# Altium PCB External_Camera_HAT.PcbDoc (part 3 of 3)
Units mm, origin at the board's own origin, x right, y up, seen from the top; angles counter-clockwise.
Board outline 65 x 56 mm, 4 copper layers (Top Layer, GND Top, GND Bottom, Bottom Layer), stack 1.586 mm thick; 123 components, 112 nets, 537 pads, 357 vias.
Unrouted connection lines stored in the file: 85.
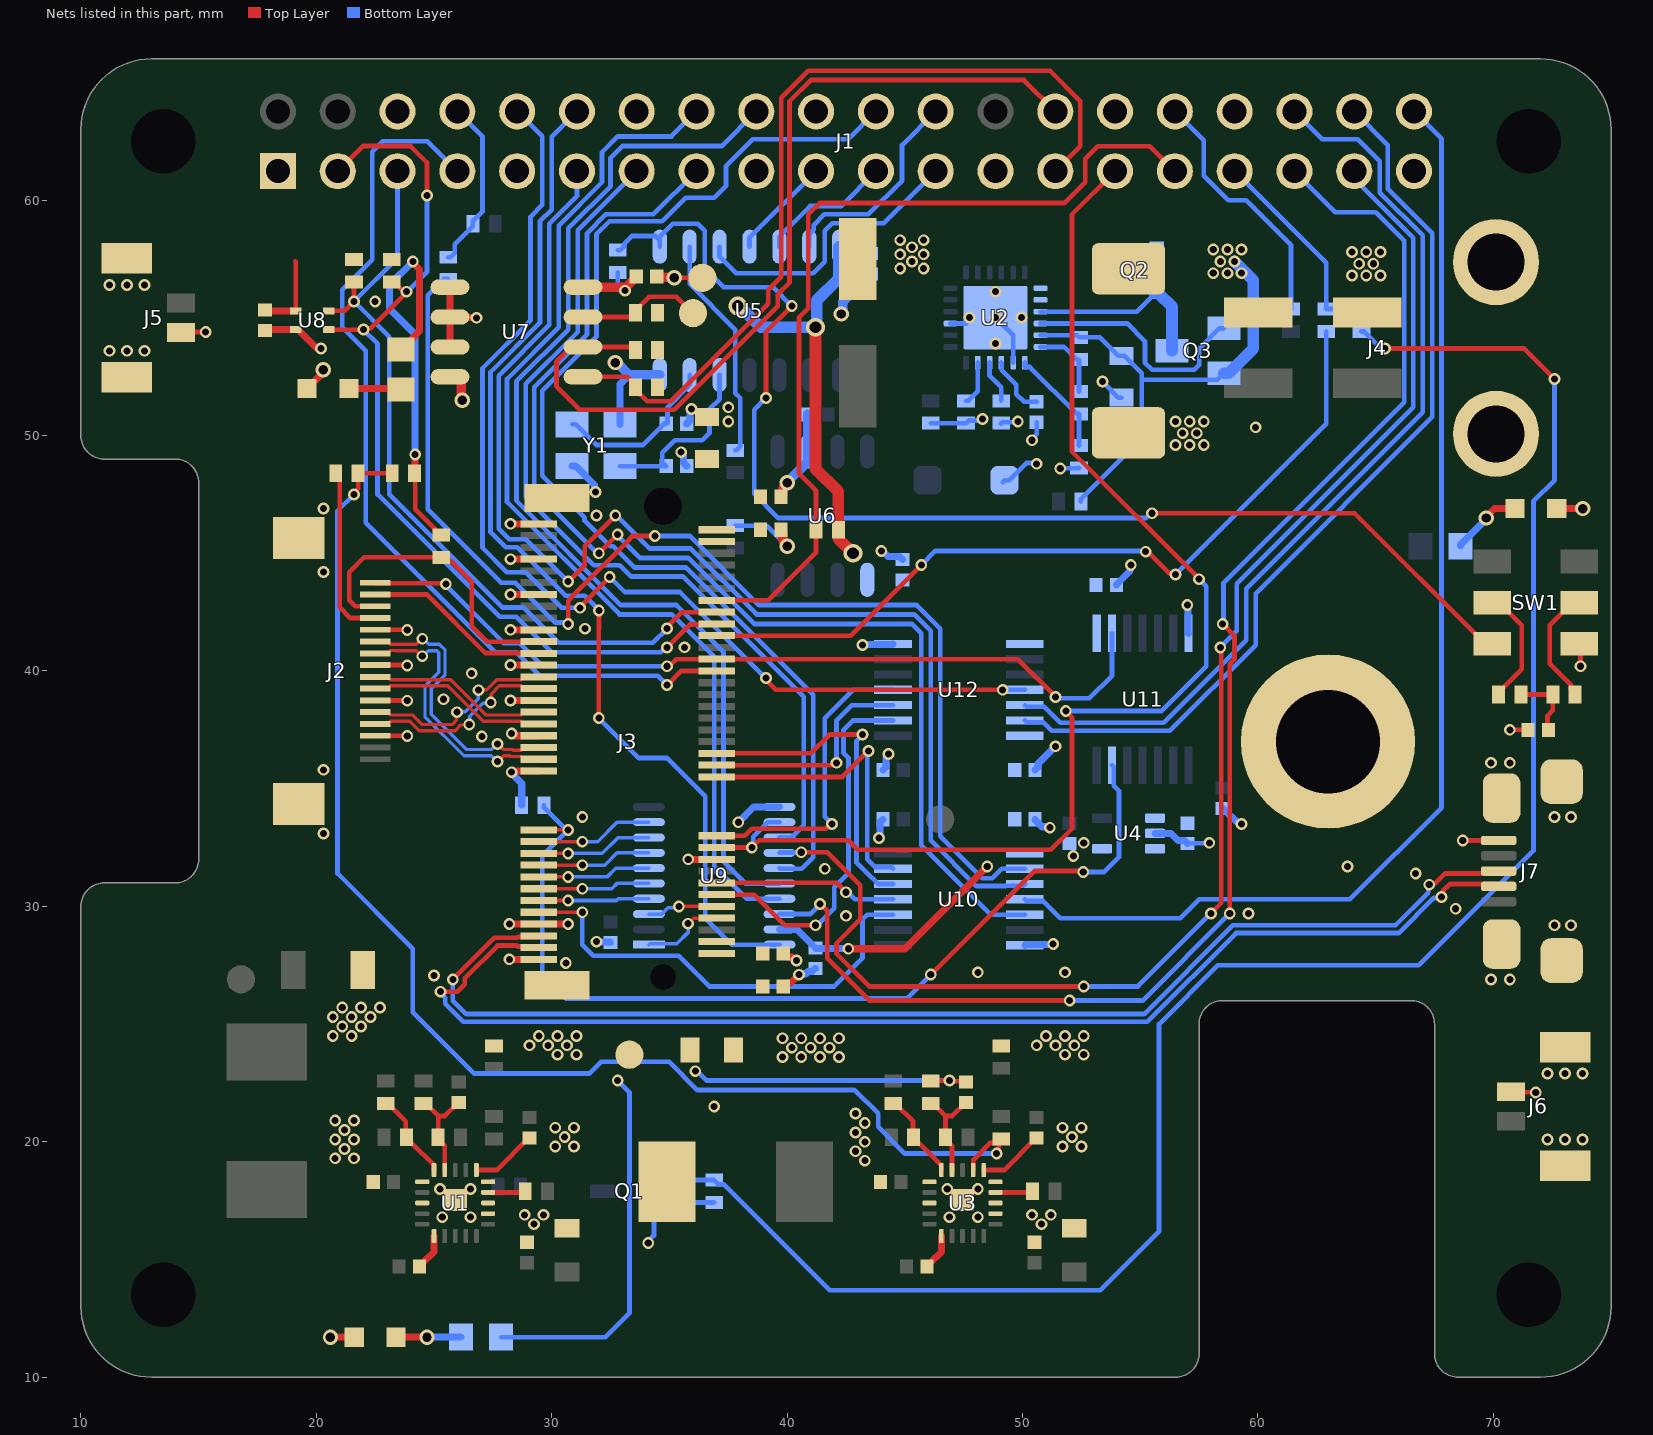
[diagram p4: the nets of this part, all layers, seen from the top]

## Via types
v1: diameter 0.5, hole 0.3, Top Layer to Bottom Layer, tented both sides, 342 vias
v2: diameter 0.65, hole 0.4, Top Layer to Bottom Layer, tented both sides, 12 vias
v3: diameter 0.8, hole 0.5, Top Layer to Bottom Layer, tented both sides, 3 vias

## Nets (pads, with @x,y where several pads share a name; then routed paths per layer and width w, separated by ;. In a path a pad name is that pad's centre, name@x,y a point inside that pad or via, vN(x,y) a via of type N, cw(c..) or ccw(c..) an arc to the next point about the centre after c; other vN are vias at no path point) (continued)
GND: C2.2 C3.2 C4.2 C5.2 C6.2 C7.2 C8.2 C9.2 C12.2 C13.2 C14.2 C15.2 C17.2 C18.2 C19.2 C20.2 C23.2 C24.2 C25.2 C26.2 C28.2 C29.2 C30.2 C31.2 C32.2 C33.2 C34.2 C35.1 C36.2 C37.2 C38.2 C39.2 C40.2 C41.2 D1.2 D2.2 D3.2 D4.1 D5.1 J1.06 J1.09 J1.14 J1.20 J1.25 J1.30 J1.34 J1.39 J2.5 J2.8 J2.11 J2.14 J2.S1 J2.S2 J3.1 J3.7 J3.18 J3.33 J3.39 J3.45 J3.51 J3.57 J3.63 J3.69 J3.75 J3.76 J3.77 J4.1 J4.5 J4.6 J5.2 J5.3 J5.4 J6.2 J6.3 J6.4 J7.5 J7.6 J7.7 J7.8 J7.9 MP1.1 Q1.2 R6.2 R28.2 R34.2 R41.2 R42.2 R43.2 R44.2 R45.2 R46.2 SW1.6 TP5.TP U1.7 U1.8 U1.10 U1.16 U1.18 U1.21 U2.8 U2.15 U2.25 U3.7 U3.8 U3.10 U3.16 U3.18 U3.21 U4.2 U4.4 U5.7 U6.2 U7.1 U7.2 U7.3 U7.4 U8.4 U9.11 U10.7 U11.7 U12.7 Y1.2 Y1.4 | length 90
  Top Layer w0.2: J5.2@14.25,54.375 14.275,54.4 v1(15.3,54.4) ; J2.14@22.5,37.25 v1@23.85,37.25 ; J2.11@22.5,38.75 v1@23.85,38.75 ; J2.8@22.5,40.25 v1@23.85,40.25 ; J2.5@22.5,41.75 v1@23.85,41.75 ; v2(35.2,56.7) TP5.TP@36.4,56.7 ; v1(68.7,32.8) J7.5@70.225,32.8 ; v1(70.7,37.5) C35.1@71.465,37.5 ; J6.2@70.75,22.125 70.775,22.1 v1(71.8,22.1) ; SW1.6@73.65,41.15 73.7,41.1 v1(73.7,40.2)
  Top Layer w0.3: C39.2@17.825,54.465 17.86,54.5 19.225,54.5 19.987,53.738 20.162,53.738 v1(20.2,53.7) ; D2.2@19.611,52 20.233,52.622 20.233,52.733 v2(20.3,52.8) ; v2(20.6,11.7) D3.2@21.611,11.7 ; U7.4@25.675,52.495 U7.4@26.08,52.495 ; U7.3@25.675,53.765 U7.2@25.675,55.035 ; U7.1@25.675,56.305 U7.2@25.675,55.035 ; v1(26.8,55) 26.783,55.017 25.693,55.017 U7.2@25.675,55.035 ; v1(28.2,27.75) J3.1@29.45,27.75 ; v1(28.2,29.25) J3.7@29.45,29.25 v1(30.7,29.25) ; v1(28.25,38.75) J3.45@29.45,38.75 ; v1(28.25,40.25) J3.51@29.45,40.25 ; v1(28.25,41.75) J3.57@29.45,41.75 ; v1(28.25,43.25) J3.63@29.45,43.25 ; v1(28.25,44.75) J3.69@29.45,44.75 ; v1(28.25,46.25) J3.75@29.45,46.25 ; v1(28.3,35.7) 28.354,35.7 28.404,35.75 J3.33@29.45,35.75 ; v1(28.3,37.346) 28.354,37.346 28.45,37.25 J3.39@29.45,37.25 ; v1(35.8,32) J3.18@37,32 ; C2.2@39.835,26.6 39.835,26.62 39.965,26.75 40.15,26.75 v1(40.5,27.1) ; C3.2@39.835,28 39.835,27.98 39.965,27.85 40.196,27.85 40.346,27.7 v1(40.4,27.7) ; D1.2@72.689,46.9 v2(73.8,46.9)
  Top Layer w0.4: U7.4@26.08,52.495 26.152,52.423 26.152,51.548 v2(26.2,51.5) ; C38.2@34.46,56.754 34.487,56.727 35.173,56.727 v2(35.2,56.7) ; C6.2@39.735,46 39.815,45.92 39.815,45.553 40,45.368 v2(40,45.3) ; C5.2@39.735,47.4 39.815,47.48 39.815,47.747 40,47.932 v2(40,48)
  Bottom Layer w0.2: v1(34.1,15.7) 34.1,15.781 34.341,16.023 Q1.2@34.341,16.947 34.697,16.947 35.174,17.425 R34.2@36.9,17.425 ; R28.2@37.8,46.175 39.125,46.175 v2(40,45.3) ; R42.2@46.1,50.525 R44.2@47.6,50.525 47.718,50.643 48.243,50.643 v1(48.3,50.7) ; U2.15@46.937,54.763 47.6,54.763 47.75,54.913 v1(47.75,55.013) ; v1(48.85,55.013) 49.6,54.263 U2.8@49.6,53.1 ; R41.2@49.088,50.512 R41.2@49.1,50.525 49.138,50.562 49.762,50.562 v1(49.8,50.6) ; D5.1@49.157,48.022 D5.1@49.235,48.1 49.425,48.1 50.159,48.834 50.566,48.834 v1(50.6,48.8) ; v1(50.4,49.8) 50.4,49.856 50.6,50.056 C9.2@50.6,50.565 ; v1(51.6,48.6) 51.613,48.612 52.387,48.612 R43.2@52.4,48.625 ; v1(53.4,52.3) 53.4,52.284 54.073,51.611 C7.2@54.2,51.611 ; C30.2@57,32.665 57.018,32.683 57.916,32.683 v1(57.933,32.7)
  Bottom Layer w0.3: v1(28.3,35.7) 28.3,35.646 28.725,35.221 R6.2@28.725,34.3 ; Y1.4@30.868,48.7 31.018,48.7 31.82,47.898 31.82,47.642 v1(31.858,47.604) ; v1(31.9,28.5) 31.917,28.483 32.483,28.483 C18.2@32.5,28.465 ; Y1.2@32.9,50.478 32.9,52.182 33.293,52.575 ; v1(35.5,49.296) 35.5,49.242 35.605,49.137 35.605,48.83 C37.2@35.735,48.7 ; C36.2@35.735,50.5 35.865,50.63 35.865,50.998 35.942,51.075 v1(35.942,51.129) ; v1(37.926,33.574) 38.578,34.225 U9.11@39.675,34.225 ; v1(40.5,27.1) 40.538,27.138 40.8,27.138 40.897,27.235 41.05,27.235 41.18,27.365 C17.2@41.2,27.365 ; v1(43.2,41.1) 43.225,41.125 44.475,41.125 U12.7@44.5,41.15 ; v1(43.904,32.904) 43.942,32.942 43.942,33.577 C20.2@44.065,33.7 ; v1(44,45.1) 44.054,45.1 44.289,44.865 44.77,44.865 C33.2@44.9,44.735 ; C40.2@44.065,35.8 44.195,35.93 44.195,36.314 44.3,36.419 v1(44.3,36.473) ; U10.7@50.1,28.35 50.125,28.375 51.275,28.375 v1(51.3,28.4) ; C19.2@50.535,33.7 50.535,33.68 50.833,33.382 51.118,33.382 v1(51.156,33.344) ; C41.2@50.535,35.8 50.665,35.93 50.665,36.065 v1(51.4,36.8) ; C28.2@53.985,43.65 53.985,43.67 54.562,44.247 54.562,44.462 v1(54.6,44.5) ; U4.2@55.625,33.1 56.3,33.1 56.605,32.795 56.87,32.795 C30.2@57,32.665 ; v1(57,42.8) 57.025,42.775 57.025,41.625 U11.7@57.05,41.6 ; C29.2@58.5,34.165 58.52,34.165 59.147,33.538 59.262,33.538 v1(59.3,33.5)
  Bottom Layer w0.4: v2(32.7,53.1) 32.768,53.1 33.293,52.575 U5.7@34.59,52.575 ; v2(40,48) 40,48.017 40.865,48.883 C34.2@40.865,50.9 ; v2(42.3,55.165) 42.367,55.232 42.367,55.687 43.548,56.868 C32.2@43.568,56.868
  other v1: 29.25,16.5 50.8,16.5 25.35,16.8 26.55,16.8 46.9,16.8 48.1,16.8 28.85,16.9 29.65,16.9 50.4,16.9 51.2,16.9 25.25,18 26.55,18 46.8,18 48.1,18 43.3,19.2 20.8,19.3 21.6,19.3 42.9,19.6 21.2,19.7 30.15,19.8 30.95,19.8 51.7,19.8 52.5,19.8 43.3,20 20.8,20.1 21.6,20.1 72.3,20.1 73.045,20.1 73.79,20.1 30.55,20.2 52.1,20.2 42.9,20.4 21.2,20.5 30.15,20.6 30.95,20.6 51.7,20.6 52.5,20.6 43.3,20.8 20.8,20.9 21.6,20.9 42.9,21.2 36.9,21.5 72.3,22.9 73.045,22.9 73.79,22.9 39.8,23.6 40.6,23.6 41.4,23.6 42.2,23.6 30.25,23.7 31.05,23.7 51.8,23.7 52.6,23.7 40.2,24 41,24 41.8,24 29.05,24.1 29.85,24.1 30.65,24.1 50.6,24.1 51.4,24.1 52.2,24.1 39.8,24.4 40.6,24.4 41.4,24.4 42.2,24.4 20.7,24.5 21.5,24.5 29.45,24.5 30.25,24.5 31.05,24.5 51,24.5 51.8,24.5 52.6,24.5 21.1,24.9 21.9,24.9 20.7,25.3 21.5,25.3 22.3,25.3 21.1,25.7 21.9,25.7 22.7,25.7 69.9,26.9 70.7,26.9 24.994,27.06 48.1,27.2 51.8,27.2 30.6,27.6 72.6,29.2 73.3,29.2 42.5,29.6 59.6,29.7 68.4,29.9 66.7,31.4 41.6,31.6 63.8,31.7 52.156,32.144 52.6,32.7 20.3,33.1 31.3,33.8 72.6,33.8 73.3,33.8 20.3,35.8 69.9,36.1 70.7,36.1 27.031,37.216 23.863,37.237 23.863,38.737 25.4,38.8 26.6,39.9 23.863,40.237 35.64,41.004 23.863,41.737 31.412,41.797 20.3,44.2 31.9,46.6 20.3,46.9 56.5,49.6 57.1,49.6 57.7,49.6 56.8,50.1 57.4,50.1 59.904,50.349 37.5,50.6 56.5,50.6 57.1,50.6 57.7,50.6 37.5,51.2 11.21,53.6 11.955,53.6 12.7,53.6 48.85,53.913 49.95,55.013 22.5,55.7 48.85,56.113 11.21,56.4 11.955,56.4 12.7,56.4 64,56.8 64.6,56.8 65.2,56.8 44.8,57.1 45.8,57.1 64.3,57.3 64.9,57.3 45.3,57.4 44.8,57.7 45.8,57.7 64,57.8 64.6,57.8 65.2,57.8 45.3,58 44.8,58.3 45.8,58.3
I2C1_SCL: J1.05 J3.60 R33.2 U8.2 | length 34.3
  Top Layer w0.2: U8.2@20.525,55.3 21.2,55.3 v1(21.6,55.7) R33.2@21.6,56.525 ; v1(34.9,41.8) 34.9,41.881 35.519,42.5 J3.60@37,42.5
  Bottom Layer w0.2: J1.05@23.45,61.23 23.45,57.55 v1(21.6,55.7) 23.1,54.2 23.1,47.5 27.9,42.7 28.8,42.7 30.3,41.2 34.3,41.2 v1(34.9,41.8)
I2C1_SDA: J1.03 J3.58 R32.2 U8.1 | length 40.1
  Top Layer w0.2: U8.1@20.525,54.5 v1(22,54.5) 22.057,54.557 22.307,54.557 23.835,56.086 v1(23.835,56.111) 23.778,56.168 23.657,56.168 23.3,56.525 R32.2@23.2,56.525 ; J1.03@20.91,61.23 21.98,62.3 24,62.3 24.7,61.6 v1(24.7,60.2) ; v1(34.9,41) 35.875,41.975 36.975,41.975 J3.58@37,42
  Bottom Layer w0.2: v1(22,54.5) 22.6,53.9 22.6,47.5 27.8,42.3 28.5,42.3 30,40.8 34.633,40.8 34.833,41 v1(34.9,41) ; v1(23.835,56.111) 23.866,56.111 24.7,56.945 v1(24.7,60.2)
ID_SCL: J1.28 R29.2 U7.6 | length 37.5
  Top Layer w0.2: R29.2@33.55,53.632 33.417,53.765 U7.6@31.325,53.765 30.825,53.765 30.2,53.14 30.2,52.1 31.2,51.1 35.2,51.1 39.6,55.5 39.6,56 40.1,56.5 40.1,64.2 41,65.1 50.06,65.1 J1.28@51.39,63.77
ID_SDA: J1.27 R30.2 U7.5 | length 36.3
  Top Layer w0.2: U7.5@31.325,52.495 33.209,52.495 33.55,52.154 R30.2@33.55,52.054 33.55,51.954 34.052,51.452 35.052,51.452 39.2,55.6 39.2,56.2 39.755,56.755 39.755,64.355 40.9,65.5 51.166,65.5 52.455,64.211 52.455,62.295 J1.27@51.39,61.23
ID_WP: R31.2 TP4.TP U7.7 | length 5.4
  Top Layer w0.2: U7.7@31.325,55.035 33.375,55.035 R31.2@33.55,55.21 ; R31.2@33.55,55.21 33.55,55.31 34.14,55.9 35.293,55.9 35.993,55.2 TP4.TP@36,55.2
M2_3V3: C2.1 C3.1 C4.1 C5.1 C6.1 C22.1 C23.1 J3.2 J3.4 J3.72 J3.74 L2.1 R20.1 R37.1 TP2.TP | length 28.5
  Top Layer w0.2: R20.1@46.1,22.575 46.113,22.588 46.888,22.588 v1(46.9,22.6) 46.932,22.568 47.567,22.568 C22.1@47.6,22.535
  Bottom Layer w0.2: R37.1@27.851,11.7 32.283,11.7 33.3,12.717 33.3,22.1 v1(32.8,22.6) ; v1(36.1,23) 36.181,23 36.581,22.6 v1(46.9,22.6)
M2_I2C_ALERT#: J1.31 J3.62 R10.2 | length 37.7
  Top Layer w0.2: J3.62@37,43 39.2,43 41.225,45.025 R10.2@41.225,46 41.225,47.675 40.5,48.4 40.5,55 40.9,55.4 40.9,59.4 41.377,59.877 51.777,59.877 52.66,60.76 52.66,61.76 53.195,62.295 55.405,62.295 J1.31@56.47,61.23
M2_PCM_CLK_1V8: J3.8 U9.1 | length 3.6
  Top Layer w0.15: v1(35.79,29.266) 35.805,29.266 36.04,29.5 J3.8@37,29.5
  Bottom Layer w0.15: U9.1@34.125,28.375 34.165,28.415 35.315,28.415 35.79,28.89 v1(35.79,29.266)
M2_PCM_CLK_3V3: J1.12 U9.20 | length 44.7
  Top Layer w0.2: v1(32,38) 32,41.787 32.004,41.791 32.004,42.562 v1(32,42.566)
  Bottom Layer w0.2: J1.12@31.07,63.77 30,62.7 30,59.6 29.5,59.1 29.5,54.8 27.4,52.7 27.4,45.9 28.046,45.254 28.532,45.254 30.586,43.2 31.4,43.2 32,42.6 v1(32,42.566) ; v1(32,38) 33.7,36.3 34.9,36.3 36.52,34.68 36.52,29.5 37.645,28.375 U9.20@39.675,28.375
M2_PCM_IN_1V8: J3.14 U10.11 | length 7.8
  Top Layer w0.2: J3.14@37,31 42.1,31 v1(42.5,30.6)
  Bottom Layer w0.2: v1(42.5,30.6) 42.581,30.6 42.881,30.3 U10.11@44.5,30.3
M2_PCM_IN_3V3: J1.40 U10.4 | length 50
  Bottom Layer w0.2: U10.4@50.1,30.3 50.175,30.225 50.875,30.225 51.6,29.5 56.7,29.5 57.5,30.3 63.9,30.3 67.8,34.2 67.8,62.6 J1.40@66.63,63.77
M2_PCM_OUT_1V8: J3.12 U12.2 | length 16
  Top Layer w0.2: J3.12@37,30.5 37.002,30.498 38.602,30.498 39.9,29.2 v1(41.2,29.2)
  Bottom Layer w0.2: v1(41.2,29.2) 41.281,29.2 42,29.919 42,30.387 41.996,30.391 41.996,30.809 42.604,31.417 42.604,36.309 42.39,36.523 42.39,37.49 42.8,37.9 U12.2@44.5,37.9
M2_PCM_OUT_3V3: J1.38 U12.13 | length 38.6
  Bottom Layer w0.2: U12.13@50.1,37.9 50.175,37.825 50.875,37.825 51.244,37.456 56.256,37.456 59.9,41.1 59.9,43.29 67.4,50.79 67.4,58.6 65.519,60.481 65.519,62.341 J1.38@64.09,63.77
M2_PCM_SYNC_1V8: J3.10 U9.3 | length 3
  Top Layer w0.15: v1(35.4,30) J3.10@37,30
  Bottom Layer w0.15: U9.3@34.125,29.675 34.675,29.675 34.933,29.933 35.333,29.933 v1(35.4,30)
M2_PCM_SYNC_3V3: J1.35 U9.18 | length 61.7
  Top Layer w0.2: v1(41.4,30.1) 41.413,30.1 41.704,29.809 41.704,28.991 41.7,28.987 41.7,27.8 43.5,26 v1(52,26) ; v1(58.5,42) 59,41.5 59,40.5 58.796,40.296 58.796,33.291 58.8,33.287 v1(58.8,29.7)
  Bottom Layer w0.2: U9.18@39.675,29.675 40.975,29.675 v1(41.4,30.1) ; v1(52,26) 55.1,26 v1(58.8,29.7) ; v1(58.5,42) 58.539,42.039 58.539,43.739 66.218,51.418 66.218,58.282 65.008,59.492 63.288,59.492 J1.35@61.55,61.23
M2_PWR_EN: R7.2 R8.2 R23.1 U3.12 | length 56.6
  Top Layer w0.2: v1(21.596,47.5) 21.596,47.577 21.775,47.756 R8.2@21.775,48.4 R7.2@23.225,48.4 ; U3.12@47.9,18.8 47.9,19.223 48.627,19.95 48.925,19.95 R23.1@48.993,20.018 ; v1(48.9,19.5) 48.9,19.581 48.993,19.674 R23.1@48.993,20.018 ; R23.1@49.1,20.125 R23.1@48.993,20.018
  Bottom Layer w0.2: v1(21.596,47.5) 21.596,47.496 20.9,46.8 20.9,31.4 24.1,28.2 24.1,25.5 26.7,22.9 31.6,22.9 32.1,23.4 34.987,23.4 36.187,22.2 42.876,22.2 43.865,21.211 43.865,20.635 45,19.5 v1(48.9,19.5)
M2_SDIO_CLK_1V8: J3.9 U10.10 | length 19.4
  Top Layer w0.15: J3.9@29.45,29.75 v1(31.3,29.75)
  Bottom Layer w0.2: v1(31.3,29.75) 31.3,28.371 31.771,27.9 34.64,27.9 cw(c34.725,27) 34.81,27.9 35.4,27.9 36.7,26.6 40.287,26.6 40.291,26.596 40.709,26.596 40.713,26.6 42,26.6 43.2,27.8 43.2,29.45 43.4,29.65 U10.10@44.5,29.65
M2_SDIO_CLK_3V3: J1.15 U10.5 | length 51.9
  Top Layer w0.2: v1(32,45) v1(32.8,45.8)
  Bottom Layer w0.2: v1(32,45) 31.941,45 29.263,47.679 29.263,52.063 31.5,54.3 31.5,58.6 32.3,59.4 34.32,59.4 J1.15@36.15,61.23 ; v1(32.8,45.8) 32.8,45.743 33.743,44.8 35.8,44.8 38.6,42 45.3,42 45.7,41.6 45.7,32.6 48.65,29.65 U10.5@50.1,29.65
M2_SDIO_CMD_1V8: J3.11 U9.4 | length 4.7
  Top Layer w0.15: J3.11@29.45,30.25 v1(30.7,30.25)
  Bottom Layer w0.15: v1(30.7,30.25) 32.75,30.25 32.825,30.325 U9.4@34.125,30.325
M2_SDIO_CMD_3V3: J1.16 U9.17 | length 45
  Bottom Layer w0.2: J1.16@36.15,63.77 35.085,62.705 32.805,62.705 32.135,62.035 32.135,60.755 30.3,58.92 30.3,54.6 28.1,52.4 28.1,47.179 32.879,42.4 35.1,42.4 36.9,40.6 36.9,31.7 38.275,30.325 U9.17@39.675,30.325
M2_SDIO_DATA0_1V8: J3.13 U9.5 | length 4.8
  Top Layer w0.15: J3.13@29.45,30.75 v1(31.3,30.75)
  Bottom Layer w0.15: v1(31.3,30.75) 32.55,30.75 32.775,30.975 U9.5@34.125,30.975
M2_SDIO_DATA0_3V3: J1.18 U9.16 | length 46.3
  Bottom Layer w0.2: J1.18@38.69,63.77 37.22,62.3 33,62.3 32.5,61.8 32.5,60.6 30.7,58.8 30.7,54.5 28.5,52.3 28.5,47.242 32.942,42.8 35.3,42.8 37.3,40.8 37.3,31.9 38.225,30.975 U9.16@39.675,30.975
M2_SDIO_DATA1_1V8: J3.15 U9.6 | length 4.8
  Top Layer w0.15: J3.15@29.45,31.25 v1(30.7,31.25)
  Bottom Layer w0.15: v1(30.7,31.25) 32.35,31.25 32.725,31.625 U9.6@34.125,31.625
M2_SDIO_DATA1_3V3: J1.22 U9.15 | length 49.7
  Bottom Layer w0.2: U9.15@39.675,31.625 39.7,31.6 40.613,31.6 41.104,32.091 41.104,38.996 35.7,44.4 33.5,44.4 32.604,45.296 32.491,45.296 31.396,46.391 31.396,46.504 29.6,48.3 29.6,51.9 31.9,54.2 31.9,58.546 32.454,59.1 34.7,59.1 35.7,60.1 36.9,60.1 37.4,60.6 37.4,61.446 38.547,62.593 42.593,62.593 J1.22@43.77,63.77
M2_SDIO_DATA2_1V8: J3.17 U9.7 | length 4.9
  Top Layer w0.15: J3.17@29.45,31.75 v1(31.3,31.75)
  Bottom Layer w0.15: v1(31.3,31.75) 32.25,31.75 32.775,32.275 U9.7@34.125,32.275
M2_SDIO_DATA2_3V3: J1.37 U9.14 | length 61.3
  Top Layer w0.2: v1(40.6,32.3) 41.7,32.3 43.1,30.9 43.1,29.444 42.096,28.44 42.096,27.991 43.487,26.6 v1(52.6,26.6) ; v1(58,29.7) 58.444,30.144 58.444,40.956 v1(58.4,41)
  Bottom Layer w0.2: U9.14@39.675,32.275 39.688,32.287 40.588,32.287 v1(40.6,32.3) ; v1(52.6,26.6) 54.9,26.6 v1(58,29.7) ; v1(58.4,41) 59.1,41.7 59.1,43.7 66.6,51.2 66.6,58.4 64.09,60.91 J1.37@64.09,61.23
M2_SDIO_DATA3_1V8: J3.19 U9.8 | length 5
  Top Layer w0.15: J3.19@29.45,32.25 v1(30.7,32.25)
  Bottom Layer w0.15: v1(30.7,32.25) 32.15,32.25 32.825,32.925 U9.8@34.125,32.925
M2_SDIO_DATA3_3V3: J1.13 U9.13 | length 37.8
  Bottom Layer w0.2: J1.13@33.61,61.23 31.1,58.72 31.1,54.4 28.9,52.2 28.9,47.387 31.791,44.496 32.894,44.496 33.38,44.01 35.59,44.01 40.7,38.9 40.7,33.442 40.183,32.925 U9.13@39.675,32.925
M2_SDIO_RESET#_1V8: J3.23 R6.1 U11.13 | length 40.8
  Top Layer w0.15: J3.23@29.45,33.25 v1(30.7,33.25)
  Top Layer w0.2: v1(46.1,27.104) 50.496,31.5 52.543,31.5 v1(52.579,31.464)
  Bottom Layer w0.2: R6.1@29.675,34.3 29.675,34.2 30.625,33.25 v1(30.7,33.25) 29.6,32.15 29.6,27.1 30.61,26.09 45.1,26.09 46.1,27.09 v1(46.1,27.104) ; v1(52.579,31.464) 53.464,31.464 54.1,32.1 54.1,34.9 53.875,35.125 53.875,35.925 U11.13@53.8,36
M2_SDIO_WAKE#_1V8: J3.21 U9.9 | length 5
  Top Layer w0.15: J3.21@29.45,32.75 v1(31.3,32.75)
  Bottom Layer w0.15: v1(31.3,32.75) 31.95,32.75 32.775,33.575 U9.9@34.125,33.575
M2_SUSCLK: J1.07 J3.50 | length 39
  Top Layer w0.2: v1(34.9,39.4) 35.5,40 J3.50@37,40
  Bottom Layer w0.2: J1.07@25.99,61.23 24.72,62.5 22.817,62.5 22.377,62.06 22.377,57.477 21.096,56.196 21.096,54.604 22.1,53.6 22.1,46.3 27.6,40.8 28.5,40.8 29.5,39.8 34.5,39.8 v1(34.9,39.4)
M2_UART_CTS_1V8: J3.36 U10.12 | length 14
  Top Layer w0.2: J3.36@37,36.5 41,36.5 41.8,37.3 v1(43.2,37.3)
  Bottom Layer w0.2: v1(43.2,37.3) 43.2,37.283 42.949,37.033 42.949,31.855 43.614,31.19 43.635,31.19 43.875,30.95 U10.12@44.5,30.95
M2_UART_CTS_3V3: J1.11 U10.3 | length 53.2
  Top Layer w0.2: v1(30.7,43.8) 31.4,44.5 31.4,45.3 v1(32.7,46.6)
  Bottom Layer w0.2: v1(30.7,43.8) 28.9,45.6 28.187,45.6 27.746,46.041 27.746,52.546 29.9,54.7 29.9,59 31.07,60.17 J1.11@31.07,61.23 ; v1(32.7,46.6) 32.762,46.6 34.162,45.2 35.9,45.2 38.7,42.4 45.4,42.4 46.1,41.7 46.1,32.8 48.038,30.862 49.283,30.862 49.296,30.875 50.025,30.875 U10.3@50.1,30.95
M2_UART_RTS_1V8: J3.34 U12.3 | length 9.6
  Top Layer w0.2: J3.34@37,36 41.919,36 42.019,36.1 v1(42.1,36.1)
  Bottom Layer w0.2: v1(42.1,36.1) 42.1,37.9 42.75,38.55 U12.3@44.5,38.55
M2_UART_RTS_3V3: J1.36 U12.12 | length 39.9
  Bottom Layer w0.2: U12.12@50.1,38.55 50.175,38.475 50.925,38.475 51.603,37.797 55.997,37.797 59.5,41.3 59.5,43.5 67,51 67,58.5 65.177,60.323 65.177,61.649 64.233,62.593 62.727,62.593 J1.36@61.55,63.77
M2_UART_RXD_1V8: J3.32 U10.13 | length 12.8
  Top Layer w0.2: J3.32@37,35.5 42.349,35.5 v1(43.453,36.605)
  Bottom Layer w0.2: v1(43.453,36.605) 43.4,36.551 43.4,32 43.725,31.675 44.425,31.675 U10.13@44.5,31.6
M2_UART_RXD_3V3: R1.1 U10.2 | length 51.1
  Top Layer w0.2: v1(30.7,42) 30.7,42.987 31.009,43.296 33.304,45.591 33.304,45.62 33.421,45.737 v1(34.378,45.737)
  Bottom Layer w0.2: R1.1@25.6,56.625 25.575,56.65 25.425,56.65 24.735,55.96 24.735,46.865 27.846,43.754 28.459,43.754 30.155,42.057 30.643,42.057 v1(30.7,42) ; v1(34.378,45.737) 35.863,45.737 38.8,42.8 45.5,42.8 46.5,41.8 46.5,32.987 48.291,31.196 48.709,31.196 49.113,31.6 U10.2@50.1,31.6
M2_UART_TXD_1V8: J3.22 U12.4 | length 13.1
  Top Layer w0.2: J3.22@37,33 38.205,33 38.505,33.3 41.633,33.3 41.833,33.5 v1(41.9,33.5)
  Bottom Layer w0.2: v1(41.9,33.5) 41.596,33.804 41.596,37.996 42.8,39.2 U12.4@44.5,39.2
M2_UART_TXD_3V3: J1.10 U12.11 | length 46.7
  Top Layer w0.2: v1(31.204,42.683) 31.204,42.733 v1(32.463,43.992) ; v1(39.1,39.7) 39.1,39.619 39.519,39.2 v1(49.154,39.2)
  Bottom Layer w0.2: J1.10@28.53,63.77 29.595,62.705 29.595,59.795 29.1,59.3 29.1,54.9 27.059,52.859 27.059,45.229 28.087,44.2 28.9,44.2 30.417,42.683 v1@31.215,42.683 ; v1(32.463,43.992) 33.1,43.355 35.445,43.355 v1(39.1,39.7) ; v1(49.154,39.2) U12.11@50.1,39.2
M2_USB_N: J3.5 J7.3 | length 52.7
  Top Layer w0.2: v1(25.8,26.9) 27.563,28.663 28.514,28.663 28.551,28.7 29.4,28.7 J3.5@29.45,28.75 ; v1(67.277,30.923) 67.334,30.981 67.539,30.981 67.959,31.4 70.125,31.4 J7.3@70.225,31.5
  Bottom Layer w0.2: v1(25.8,26.9) 25.8,26 26.373,25.427 55.165,25.427 58.934,29.196 65.842,29.196 67.234,30.588 67.234,30.88 v1(67.277,30.923)
M2_USB_P: J3.3 J7.2 | length 53.4
  Top Layer w0.2: v1(25.277,26.377) 25.989,26.377 26.304,26.691 26.304,26.942 27.699,28.337 28.514,28.337 28.551,28.3 29.4,28.3 J3.3@29.45,28.25 ; v1(67.8,30.4) 67.857,30.457 67.857,30.662 68.145,30.95 70.125,30.95 J7.2@70.225,30.85
  Bottom Layer w0.2: v1(25.277,26.377) 25.277,26.306 25.473,26.11 25.473,25.865 26.238,25.1 55.3,25.1 59.069,28.869 65.977,28.869 67.465,30.357 67.757,30.357 v1(67.8,30.4)
M2_W_DISABLE1#: J3.56 R3.2 | length 34.4
  Top Layer w0.2: J3.56@37,41.5 42.7,41.5 v1(45.7,44.5) ; v1(55.231,45.069) 55.312,45.069 56.224,44.157 56.443,44.157 v1(56.5,44.1)
  Bottom Layer w0.2: v1(45.7,44.5) 46.3,45.1 55.2,45.1 v1(55.231,45.069) ; v1(56.5,44.1) 62.9,50.5 R3.2@62.9,54.425
M2_WAKE#: J1.29 J3.20 U9.12 | length 53.6
  Top Layer w0.2: J3.20@37,32.5 v1(38.5,32.5) 38.805,32.805 42.595,32.805 43,32.4 44.687,32.4 44.691,32.396 45.109,32.396 45.113,32.4 51.2,32.4 52.1,33.3 52.1,38.037 51.839,38.298 v1(51.839,38.304) ; J1.29@53.93,61.23 52.1,59.4 52.1,49.313 57.5,43.913 v1(57.5,43.9)
  Bottom Layer w0.2: v1(38.5,32.5) 38.557,32.557 38.557,32.964 39.168,33.575 U9.12@39.675,33.575 ; v1(51.839,38.304) 55.904,38.304 57.8,40.2 57.8,43.6 v1(57.5,43.9)
NetC9_1: C9.1 U2.9 | length 2.6
  Bottom Layer w0.2: U2.9@49.1,53.1 49.12,53.08 49.12,52.78 49.735,52.165 49.735,51.765 50.065,51.435 C9.1@50.6,51.435
NetC10_2: C10.2 U1.1 | length 1.6
  Top Layer w0.3: C10.2@24.385,14.7 24.385,14.72 24.768,15.103 24.788,15.103 25,15.315 U1.1@25,16
NetC11_2: C11.2 R14.2 R15.1 U1.14 | length 4.4
  Top Layer w0.2: R14.2@24.55,21.625 24.65,21.625 25.175,21.1 ; U1.14@25.45,18.8 25.45,19.825 25.175,20.1 R15.1@25.175,20.2 25.175,21.1 ; C11.2@26.05,21.665 26.03,21.665 25.465,21.1 25.175,21.1
NetC16_1: C16.1 U1.11 | length 2.8
  Top Layer w0.2: U1.11@26.8,18.8 27.665,18.8 29.03,20.165 C16.1@29.05,20.165
NetC21_2: C21.2 U3.1 | length 1.6
  Top Layer w0.3: C21.2@45.935,14.7 45.935,14.72 46.318,15.103 46.338,15.103 46.55,15.315 U3.1@46.55,16
NetC22_2: C22.2 R20.2 R21.1 U3.14 | length 4.4
  Top Layer w0.2: R20.2@46.1,21.625 46.2,21.625 46.725,21.1 ; U3.14@47,18.8 47,19.825 46.725,20.1 R21.1@46.725,20.2 46.725,21.1 ; C22.2@47.6,21.665 47.58,21.665 47.015,21.1 46.725,21.1
NetC27_1: C27.1 U3.11 | length 2.8
  Top Layer w0.2: U3.11@48.35,18.8 49.215,18.8 50.58,20.165 C27.1@50.6,20.165
NetC35_2: C35.2 R25.2 R26.2 | length 3
  Top Layer w0.2: R25.2@71.175,39 R26.2@72.525,39 72.525,38.325 72.3,38.1 72.3,37.535 C35.2@72.335,37.5
NetC36_1: C36.1 U5.6 Y1.1 | length 7.2
  Bottom Layer w0.2: Y1.1@30.868,50.478 31.018,50.478 31.896,49.6 33.885,49.6 C36.1@34.825,50.54 ; C36.1@34.865,50.5 34.918,50.553 34.918,51.208 35.86,52.15 U5.6@35.86,52.575
NetC37_1: C37.1 U5.5 Y1.3 | length 7.6
  Bottom Layer w0.2: Y1.3@32.9,48.7 34.783,48.7 C37.1@34.865,48.7 34.7,48.865 34.7,49.27 35.23,49.8 36.391,49.8 36.7,50.109 36.7,51.113 37.13,51.543 U5.5@37.13,52.575
NetD1_1: D1.1 R35.2 | length 3.1
  Top Layer w0.3: v2(69.7,46.5) 69.7,46.545 70.055,46.9 D1.1@70.911,46.9
  Bottom Layer w0.3: R35.2@68.6,45.3 68.6,45.364 69.7,46.464 v2(69.7,46.5)
NetD2_1: D2.1 R36.2 | length 2.2
  Top Layer w0.3: D2.1@21.389,52 23.549,52 R36.2@23.6,51.949
NetD3_1: D3.1 R37.2 | length 2.8
  Top Layer w0.3: D3.1@23.389,11.7 v2(24.7,11.7)
  Bottom Layer w0.3: v2(24.7,11.7) R37.2@26.149,11.7
NetJ1_08: J1.08 R1.2 R2.2 | length 7.3
  Bottom Layer w0.2: R1.2@25.6,57.575 25.7,57.575 25.875,57.75 25.875,58.125 26.65,58.9 R2.2@26.65,59 26.65,59.1 27.055,59.505 27.055,62.705 J1.08@25.99,63.77
NetJ1_32: J1.32 R4.2 | length 10.9
  Bottom Layer w0.2: J1.32@56.47,63.77 57.7,62.54 57.7,61.034 58.734,60 59.5,60 61.4,58.1 R4.2@61.4,55.375
NetJ1_33: J1.33 R3.1 R5.1 | length 9
  Bottom Layer w0.2: J1.33@59.01,61.23 62.9,57.34 R3.1@62.9,55.375 R5.1@64.4,55.375
NetQ2_4: Q2.4 Q3.3 U2.3 | length 8
  Bottom Layer w0.2: U2.3@50.762,55.263 54.847,55.263 55.635,56.05 Q2.4@55.7,56.05
  Bottom Layer w0.5: Q2.4@55.7,56.05 55.765,56.05 56.353,55.463 Q3.3@56.353,53.6
NetQ2_5-6-7-8: Q2.5-6-7-8 U2.1 U2.2
NetQ3_1: Q3.1 U2.4 | length 10.3
  Bottom Layer w0.2: U2.4@50.762,54.763 54.437,54.763 55.2,54 55.2,53.1 55.5,52.8 57.3,52.8 57.5,53 57.5,53.697 58.353,54.55 Q3.1@58.553,54.55
NetR11_2: R11.2 U1.9 | length 1.6
  Top Layer w0.2: U1.9@27.3,17.85 28.825,17.85 R11.2@28.875,17.9
NetR12_2: R12.2 R16.1 U1.15 | length 3.8
  Top Layer w0.2: R16.1@22.95,21.625 23.05,21.625 23.8,20.875 23.8,20.225 R12.2@23.825,20.2 23.825,20.1 24,19.925 24.075,19.925 25,19 U1.15@25,18.8
NetR18_2: R18.2 U3.9 | length 1.6
  Top Layer w0.2: U3.9@48.85,17.85 50.375,17.85 R18.2@50.425,17.9
NetR19_2: R19.2 R22.1 U3.15 | length 3.8
  Top Layer w0.2: R22.1@44.5,21.625 44.6,21.625 45.35,20.875 45.35,20.225 R19.2@45.375,20.2 45.375,20.1 45.55,19.925 45.625,19.925 46.55,19 U3.15@46.55,18.8
NetR25_1: R25.1 SW1.2 | length 5
  Top Layer w0.2: SW1.2@69.95,42.9 70.25,42.9 71.2,41.95 71.2,40.075 70.225,39.1 R25.1@70.225,39
NetR26_1: R26.1 SW1.5 | length 5
  Top Layer w0.2: R26.1@73.475,39 73.3,39.175 73.3,39.4 72.4,40.3 72.4,41.95 73.35,42.9 SW1.5@73.65,42.9
NetR27_2: R27.2 U5.9 | length 9.6
  Bottom Layer w0.2: U5.9@35.86,58.025 35.86,56.44 37.8,54.5 37.8,51.8 38.004,51.596 38.004,49.55 37.829,49.375 R27.2@37.8,49.375
NetR38_2: R38.2 R40.1 U2.6 | length 3.2
  Bottom Layer w0.2: U2.6@50.762,53.763 51.762,53.763 52.3,53.225 R38.2@52.4,53.225 R40.1@52.4,51.875
NetR40_2: R40.2 R43.1 U2.7 | length 4.7
  Bottom Layer w0.2: U2.7@50.1,53.1 50.1,52.93 50.12,52.91 50.315,52.91 52.3,50.925 R40.2@52.4,50.925 R43.1@52.4,49.575
NetR41_1: R41.1 U2.10 | length 1.8
  Bottom Layer w0.2: U2.10@48.6,53.1 48.6,52.55 49.1,52.05 R41.1@49.1,51.475
NetR44_1: R44.1 U2.11 | length 1.9
  Bottom Layer w0.2: R44.1@47.6,51.475 47.7,51.475 48.1,51.875 U2.11@48.1,53.1
PCIE_CLK_N: J2.12 J3.49 | length 8.4
  Top Layer w0.14: J2.12@22.5,38.25 23.025,38.25 23.141,38.134 24.08,38.134 24.484,37.73 25.786,37.73 25.954,37.898 25.954,38.232 v1(25.972,38.25) ; v1(26.886,39.186) 26.904,39.204 27.238,39.204 27.668,39.634 28.709,39.634 28.825,39.75 J3.49@29.45,39.75
  Bottom Layer w0.14: v1(25.972,38.25) 25.99,38.268 26.325,38.268 26.879,38.822 26.879,39.179 v1(26.886,39.186)
PCIE_CLK_P: J2.13 J3.47 | length 8.4
  Top Layer w0.14: J2.13@22.5,37.75 23.025,37.75 23.141,37.866 23.969,37.866 24.373,37.462 25.897,37.462 26.143,37.708 26.477,37.708 v1(26.495,37.727) ; v1(27.409,38.663) 27.427,38.681 27.427,39.015 27.779,39.366 28.709,39.366 28.825,39.25 J3.47@29.45,39.25
  Bottom Layer w0.14: v1(26.495,37.727) 26.514,37.745 26.514,38.079 27.068,38.633 27.38,38.633 v1(27.409,38.663)
PCIE_CLKREQ_N: J2.2 J3.53 | length 8
  Top Layer w0.2: J2.2@22.5,43.25 24.688,43.25 27.174,40.763 29.437,40.763 J3.53@29.45,40.75
PCIE_DET_WAKE: J2.3 J3.55 R9.2 | length 13.3
  Top Layer w0.2: J2.3@22.5,42.75 21.65,42.75 21.4,43 21.4,44.2 22.025,44.825 R9.2@25.3,44.825 25.475,44.65 25.75,44.65 26.6,43.8 26.6,41.9 27.254,41.246 29.446,41.246 J3.55@29.45,41.25
PCIE_PWR_EN: J2.4 R8.1 | length 7.5
  Top Layer w0.2: R8.1@20.825,48.4 21,48.225 21,42.7 21.45,42.25 J2.4@22.5,42.25
PCIE_RST_B: J2.1 J3.52 U11.2 | length 35.8
  Top Layer w0.2: J2.1@22.5,43.75 22.525,43.725 25.475,43.725 v1(25.5,43.7) ; v1(34.9,40.2) 34.981,40.2 35.281,40.5 J3.52@37,40.5 49.8,40.5 v1(51.4,38.9)
  Bottom Layer w0.2: v1(25.5,43.7) 25.5,43.641 27.951,41.19 28.62,41.19 29.61,40.2 v1(34.9,40.2) ; v1(51.4,38.9) 51.457,38.843 52.843,38.843 53.8,39.8 U11.2@53.8,41.6
PCIE_RX_N: J2.9 J3.43 | length 7.7
  Top Layer w0.14: J2.9@22.5,39.75 23.025,39.75 23.141,39.634 25.702,39.634 27.202,38.134 28.709,38.134 28.825,38.25 J3.43@29.45,38.25
PCIE_RX_P: J2.10 J3.41 | length 7.7
  Top Layer w0.14: J2.10@22.5,39.25 23.025,39.25 23.141,39.366 25.592,39.366 27.092,37.866 28.709,37.866 28.825,37.75 J3.41@29.45,37.75
PCIE_TX_N: J2.6 J3.37 | length 11.7
  Top Layer w0.14: J2.6@22.5,41.25 23.025,41.25 23.141,41.134 23.471,41.134 23.472,41.133 24.242,41.133 24.477,41.368 v1(24.504,41.368) ; v1(27.7,36.9) 27.726,36.9 27.962,36.664 28.332,36.664 28.362,36.634 28.709,36.634 28.825,36.75 J3.37@29.45,36.75
  Bottom Layer w0.14: v1(24.504,41.368) 24.528,41.368 24.766,41.13 25.229,41.13 25.467,40.891 25.467,39.836 24.88,39.248 24.88,38.167 26.383,36.664 27.438,36.664 27.674,36.9 v1(27.7,36.9)
PCIE_TX_P: J2.7 J3.35 | length 11.7
  Top Layer w0.14: J2.7@22.5,40.75 23.025,40.75 23.141,40.866 23.361,40.866 23.362,40.865 24.238,40.865 24.475,40.628 v1(24.5,40.628) ; v1(27.7,36.16) 27.726,36.16 27.962,36.396 28.222,36.396 28.252,36.366 28.709,36.366 28.825,36.25 J3.35@29.45,36.25
  Bottom Layer w0.14: v1(24.5,40.628) 24.528,40.628 24.762,40.862 25.118,40.862 25.2,40.78 25.2,39.946 24.612,39.359 24.612,38.057 26.273,36.396 27.438,36.396 27.674,36.16 v1(27.7,36.16)
PI_3V3: C17.1 C19.1 C28.1 C30.1 C32.1 C33.1 C38.1 C39.1 C41.1 J1.01 J1.17 R7.1 R9.1 R10.1 R24.1 R29.1 R30.1 R31.1 R32.1 R33.1 R36.1 U4.1 U4.3 U5.14 U6.5 U7.8 U8.3 U9.19 U10.1 U11.1 U12.8 U12.14 | length 53.8
  Top Layer w0.2: 19.1,57.4 19.125,57.375 U8.3@19.125,55.3 ; R7.1@24.2,48.375 24.2,46.875 25.025,46.05 25.025,45.95 25.2,45.775 R9.1@25.3,45.775
  Top Layer w0.3: C39.1@17.825,55.335 17.86,55.3 U8.3@19.125,55.3 ; R36.1@23.6,53.651 23.664,53.651 24.022,54.009 24.022,54.072 24.389,54.44 24.389,57.057 24.1,57.346 v1(24.1,57.4) ; R7.1@24.2,48.375 24.188,48.388 24.188,49.188 v1(24.2,49.2) ; v1(42.6,28.2) 45,28.2 v1(48.5,31.7)
  Top Layer w0.4: U7.8@31.325,56.305 33.161,56.305 33.59,56.734 C38.1@33.59,56.754
  Top Layer w0.5: v3(41.2,54.6) 41.2,48.6 42.175,47.625 R10.1@42.175,45.9 ; R10.1@42.175,46 42.2,45.975 42.2,45.6 v3(42.8,45)
  Bottom Layer w0.2: R24.1@32.8,56.925 32.8,56.463 v1(33.109,56.154)
  Bottom Layer w0.3: v1(24.1,57.4) 23.1,56.4 23.1,55.4 24.2,54.3 v1(24.2,49.2) ; U9.19@39.675,29.025 39.683,29.017 40.418,29.017 C17.1@41.05,28.385 ; C17.1@41.2,28.235 41.217,28.218 42.583,28.218 v1(42.6,28.2)
  Bottom Layer w0.4: U5.14@42.21,58.025 43.262,58.025 43.548,57.738 C32.1@43.568,57.738
  Bottom Layer w0.5: v3(37.9,55.5) 37.981,55.5 38.881,54.6 v3(41.2,54.6) 41.257,54.657 41.257,55.739 42.191,56.672 42.191,58.006 U5.14@42.21,58.025
PWR_CYCLE: Q1.1 R5.2 R34.1 | length 81.8
  Top Layer w0.2: v1(65.4,53.7) 71.3,53.7 v1(72.6,52.4)
  Bottom Layer w0.2: Q1.1@34.341,18.852 34.697,18.852 35.174,18.375 R34.1@36.9,18.375 37.075,18.2 37.3,18.2 41.8,13.7 53.3,13.7 55.8,16.2 55.8,25 58.3,27.5 66.83,27.5 71.7,32.37 71.7,47.2 72.6,48.1 v1(72.6,52.4) ; R5.2@64.4,54.425 64.5,54.425 65.168,53.757 65.343,53.757 v1(65.4,53.7)
SPI_CAN_CS: J1.24 U5.13 | length 9.1
  Bottom Layer w0.2: U5.13@40.94,58.025 40.94,58.558 41.125,58.743 41.125,58.941 41.584,59.4 43.446,59.4 44.88,60.834 44.88,62.34 J1.24@46.31,63.77
SPI_CLK: J1.23 U5.10 | length 12.5
  Bottom Layer w0.2: U5.10@37.13,58.025 37.13,57.6 37.83,56.9 41.1,56.9 41.591,57.391 41.591,58.691 41.916,59.016 44.096,59.016 J1.23@46.31,61.23
SPI_MISO: J1.21 U5.12 | length 5.7
  Bottom Layer w0.2: U5.12@39.67,58.025 39.67,58.45 40.971,59.751 42.291,59.751 J1.21@43.762,61.222
SPI_MOSI: J1.19 U5.11 | length 4.4
  Bottom Layer w0.2: U5.11@38.4,58.025 38.4,58.4 J1.19@41.23,61.23
TERM_DET: R24.2 SW1.3 U5.8 | length 53.6
  Top Layer w0.2: v1(39.1,51.6) 39.1,54.4 v1(40.2,55.5) ; v1(55.5,46.7) 64.1,46.7 69.65,41.15 SW1.3@69.95,41.15
  Bottom Layer w0.2: R24.2@32.8,57.875 32.9,57.875 33.075,58.05 33.075,58.15 33.4,58.475 34.405,58.475 U5.8@34.59,58.29 ; U5.8@34.59,58.025 U5.8@34.59,58.29 ; v1(39.1,51.6) 38.6,51.1 38.6,47.52 39.624,46.496 55.233,46.496 55.437,46.7 v1(55.5,46.7) ; v1(40.2,55.5) 39.4,56.3 37.3,56.3 36.5,57.1 36.5,58.7 36.2,59 35.14,59 34.59,58.45 U5.8@34.59,58.29
VIN: C7.1 D4.2 J4.3 Q2.1 Q2.2 Q2.3 Q3.2 R38.1 R39.1 U2.5 | length 20.8
  Bottom Layer w0.2: U2.5@50.762,54.263 52.312,54.263 R38.1@52.4,54.175 53.287,54.175 54.073,53.389 C7.1@54.2,53.389 54.327,53.389 55.066,52.65 55.066,52.375 ; R39.1@52.475,47.2 52.475,47.3 55.066,49.891 55.066,52.375 ; Q3.2@58.553,52.65 58.278,52.375 55.066,52.375
  Bottom Layer w0.5: Q3.2@58.553,52.65 58.753,52.65 59.8,53.697 59.8,56.6 v1(59,57.4)
  other v1: 58.1,56.9 58.7,56.9 59.3,56.9 58.4,57.4 58.1,57.9 58.7,57.9 59.3,57.9
pads on no net: J2.15 J2.16 J3. J3.6 J3.16 J3.38 J3.40 J3.42 J3.44 J3.46 J3.48 J3.54 J3.59 J3.61 J3.64 J3.65 J3.66 J3.67 J3.68 J3.70 J3.71 J3.73 J7.1 J7.4 U2.13 U2.14 U2.16 U2.19 U2.20 U2.21 U2.22 U2.23 U2.24 U5.3 U10.6 U10.9 U11.5 U11.6 U11.9 U11.10 U12.5 U12.6 U12.9 U12.10

## Polygon pours and split planes (outlines as drawn)
GND on Bottom Layer "NONET_L-01_P-001" (solid, pour order 66): 53.9,33.1 53.9,32 52.3,32 52.012,32.288 51.613,32.288 51.613,33.1
PI_3V3 on Bottom Layer "NONET_L-01_P-001" (solid, remove dead copper, pour order 51): 42.3,45.5 42.3,43 45.7,43 46.8,41.9 46.8,33 48.4,31.4 51.05,31.4 51.05,30.25 51.5,29.8 59.3,29.8 59.3,32.284 57.072,34.512 56.736,34.175 54.5,34.175 54.5,31.7 53.5,30.7 51.8,30.7 51.8,32.4 50.3,33.9 50.3,40.6 53.4,40.6 53.4,43.5 53.7,43.8 52,45.5 46.2,45.5
1V8 on Bottom Layer "NONET_L-01_P-001" (solid, pour order 52): 53.9,33.244 53.9,34.7 53.5,35.1 53.5,37.2 52.516,37.2 51,35.684 51,33.82 51.576,33.244
5V on Bottom Layer "NONET_L-01_P-001" (solid, pour order 43): 16.845,60.445 15.9,59.5 15.9,28.2 19.8,28.2 19.8,56.1 22.2,58.5 22.2,65 16.845,65
5VREG_SW on Bottom Layer "NONET_L-01_P-001" (solid, pour order 32): 28.25,16.472 24.886,16.472 24.582,16.776 23.25,16.8 23.25,15.6 28.25,15.6
15V on Bottom Layer "NONET_L-01_P-001" (solid, pour order 19): 46.303,53 46.303,55.403 46.493,55.593 47.3,55.593 47.3,56.6 45.5,56.6 44.3,55.4 44.3,53
3V3REG_SW on Bottom Layer "NONET_L-01_P-001" (solid, pour order 6): 49.8,16.472 46.436,16.472 46.132,16.776 44.8,16.8 44.8,15.6 49.8,15.6
NetQ2_5-6-7-8 on Bottom Layer "NONET_L-01_P-001" (solid, pour order 4): 54.825,58.3 54.825,55.8 51.44,55.8 51.2,55.6 50.478,55.6 50.478,57.219 51.56,58.3
VIN on Bottom Layer "NONET_L-01_P-001" (solid, pour order 1): 60.1,58.3 55.4,58.3 55.4,56.465 60.1,56.465
GND on Top Layer "NONET_L-01_P-001" (solid, pour order 65): 20.7,32.8 17.5,32.8 17.5,36.1 20.7,36.1
GND on Top Layer "NONET_L-01_P-001" (solid, pour order 64): 20.7,47.2 17.5,47.2 17.5,43.9 20.7,43.9
GND on Top Layer "NONET_L-01_P-001" (solid, pour order 63): 69.4,33.4 69.4,36.5 73.9,36.5 73.9,33.4
GND on Top Layer "NONET_L-01_P-001" (solid, pour order 62): 69.4,29.6 69.4,26.5 73.9,26.5 73.9,29.6
GND on Top Layer "NONET_L-01_P-001" (solid, pour order 61): 13.4,51.5 13.4,54 10.1,54 10.1,51.5
GND on Top Layer "NONET_L-01_P-001" (solid, pour order 60): 13.4,58.5 13.4,56 10.1,56 10.1,58.5
GND on Top Layer "NONET_L-01_P-001" (solid, pour order 59): 71.6,18 71.6,20.5 74.9,20.5 74.9,18
GND on Top Layer "NONET_L-01_P-001" (solid, pour order 53): 71.6,25 71.6,22.5 74.9,22.5 74.9,25
1V8 on Top Layer "NONET_L-01_P-001" (solid, pour order 48): 44.744,37.1 51.8,37.1 51.8,33.3 51.1,32.6 44.1,32.6 44.1,32.8 43.5,33.4 34.7,33.4 34.7,35.2 42.962,35.2
M2_3V3 on Top Layer "NONET_L-01_P-001" (solid, pour order 18): 32.5,25 32.5,27.147 32.5,43.4 35.7,46.6 35.7,48 35.7,49.6 37.5,49.6 37.5,48.7 38.117,48.083 39.2,48.083 39.2,45.352 36.017,45.352 36.017,44.217 34.4,42.6 34.4,30 35.752,28.648 39.3,28.648 39.3,25.922 37.322,25.922 36.4,25
3V3REG_SW on Top Layer "NONET_L-01_P-001" (solid, pour order 11): 45.1,17.1 42.9,17.1 42.2,17.8 42.2,20.2 39.4,20.2 39.4,16.4 40.2,15.6 45.1,15.6
15V on Top Layer "Top Layer-15V" (solid, pour order 23): 53.1,37.7 57.5,37.7 57.5,40.9 46.303,52.097 46.303,55 42.8,55 41.9,54.1 41.9,48.9
GND on Top Layer "NONET_L-01_P-001" (solid, pour order 47): 28.675,46.103 28.678,46.1 31.8,46.1 32.2,46.5 32.2,48 28.7,48
GND on Top Layer "NONET_L-01_P-001" (solid, pour order 46): 35.9,51.378 35.9,50.259 37.8,50.259 37.8,51.5 37.2,51.5 37.078,51.378
PI_3V3 on Top Layer "NONET_L-01_P-001" (solid, pour order 45): 17.122,62.5 19.3,62.5 19.6,62.2 19.6,60.4 20.4,59.6 37,59.6 37.4,60 37.4,62.5 39.7,62.5 39.755,62.445 39.755,56.155 39.744,56.155 35.041,51.452 34.052,51.452 34.052,55.81 30.3,55.81 29.01,57.1 17.072,57.1
GND on Top Layer "NONET_L-01_P-001" (solid, pour order 44): 28.675,27.897 28.678,27.9 30.8,27.9 31.33,27.37 31.7,27.37 31.7,26 28.7,26
5V on Top Layer "NONET_L-01_P-001" (solid, pour order 38): 15.9,31.025 15.9,22.375 19.8,22.375 19.8,31.025
GND on Top Layer "NONET_L-01_P-001" (solid, pour order 39): 24.804,17.221 21.529,17.221 20.2,18.55 20.2,28.4 23.2,28.4 23.2,25.521 22.15,24.471 22.15,19.2 22.758,18.592 22.758,17.585 24.796,17.585 24.796,17.586
15V on Top Layer "Top Layer-15V 1" (solid, pour order 42): 46.8,10 57.5,10 57.5,37.7 53.1,37.7 53.1,15.2 48.7,15.2 48.46,15.44 48.46,16.305 46.8,16.3 46.8,14.2 44.4,14.2 43.4,15.2 27.2,15.2 26.901,15.499 26.902,16.4 25.326,16.4 25.326,10.574 25.9,10
GND on Top Layer "NONET_L-01_P-001" (solid, pour order 40): 27.295,17.545 27.3,17.54 27.3,16.806 28.344,16.806 28.55,16.6 28.55,15.4 31.375,15.4 31.35,24.9 26.85,24.9 26.85,23.6 29.55,23.6 29.55,19.684 28.284,19.684 27.05,18.45 27.05,17.545
5VREG_SW on Top Layer "NONET_L-01_P-001" (solid, pour order 37): 23.55,17.1 20.7,17.1 19.9,17.9 19.9,19.5 15.9,19.5 15.9,16.5 16.8,15.6 23.55,15.6
5VREG_AGND on Top Layer "NONET_L-01_P-001" (solid, pour order 36): 25.25,18.5 25.25,18.85 23.85,20.25 23.85,21.135 23.456,21.529 23.456,22.005 22.539,22.005 22.522,22.022 22.522,23.5 29.45,23.5 29.45,20.7 28.225,20.7 26.025,18.5
GND on Top Layer "NONET_L-01_P-001" (solid, pour order 35): 24.15,19.1 24.15,16.5 27.7,16.5 27.65,16.55 27.65,19.1
5VREG_SW on Top Layer "NONET_L-01_P-001" (solid, pour order 34): 24.85,17.1 24.85,15.6 23.25,15.6 23.25,17.1
5VREG_SW on Top Layer "NONET_L-01_P-001" (solid, pour order 33): 27.05,16.6 27.05,15.6 28.25,15.6 28.25,16.6 27.637,16.6 27.636,16.599
GND on Top Layer "NONET_L-01_P-001" (solid, pour order 21): 41.5,59.4 41.5,55.6 46.3,55.6 46.3,59.4
GND on Top Layer "NONET_L-01_P-001" (solid, pour order 15): 48.845,17.545 48.85,17.54 48.85,16.806 49.894,16.806 50.1,16.6 50.1,15.4 52.925,15.4 52.9,24.9 48.4,24.9 48.4,23.6 51.1,23.6 51.1,19.684 49.834,19.684 48.6,18.45 48.6,17.545
3V3REG_AGND on Top Layer "NONET_L-01_P-001" (solid, pour order 10): 46.8,18.5 46.8,18.85 45.4,20.25 45.4,21.135 45.006,21.529 45.006,22.005 44.089,22.005 44.072,22.022 44.072,23.5 51,23.5 51,20.7 49.775,20.7 47.575,18.5
GND on Top Layer "NONET_L-01_P-001" (solid, pour order 14): 46.354,17.221 43.079,17.221 42.4,17.9 42.4,20.5 40.9,22 37.2,22 37.2,25 43.7,25 43.7,19.2 44.308,18.592 44.308,17.585 46.346,17.585 46.346,17.586
M2_3V3 on Top Layer "NONET_L-01_P-001" (solid, pour order 13): 32.5,25.2 32.5,16.4 36.4,16.4 36.4,25.2
3V3REG_SW on Top Layer "NONET_L-01_P-001" (solid, pour order 7): 48.6,16.6 48.6,15.6 49.8,15.6 49.8,16.6 49.187,16.6 49.186,16.599
3V3REG_SW on Top Layer "NONET_L-01_P-001" (solid, pour order 8): 46.4,17.1 46.4,15.6 44.8,15.6 44.8,17.1
GND on Top Layer "NONET_L-01_P-001" (solid, pour order 9): 45.7,19.1 45.7,16.5 49.25,16.5 49.2,16.55 49.2,19.1
GND on Top Layer "NONET_L-01_P-001" (solid, pour order 3): 52.9,51.2 52.9,49 58.1,49 58.1,51.2
GND on Top Layer "NONET_L-01_P-001" (solid, pour order 2): 66.1,54.6 66.1,58.2 63.1,58.2 63.1,54.6
VIN on Top Layer "NONET_L-01_P-001" (solid, pour order 0): 61.5,54.6 54.4,54.6 52.9,56.1 52.9,58.2 59.5,58.2 61.5,56.2
GND on GND Bottom (split plane): 243 vertices, not listed, extent 10.301,10.301 74.699,65.699
GND on GND Top (split plane): 243 vertices, not listed, extent 10.301,10.301 74.699,65.699

## Keep-outs
Keep-Out Layer:
  region: 71.5,59.4 ccw(c71.5,62.5) 74.6,62.5 ccw(c71.5,62.5) 71.5,65.6 ccw(c71.5,62.5) 68.4,62.5 ccw(c71.5,62.5)
  region: 13.5,65.6 ccw(c13.5,62.5) 10.4,62.5 ccw(c13.5,62.5) 13.5,59.4 ccw(c13.5,62.5) 16.6,62.5 ccw(c13.5,62.5)
  region: 71.5,10.4 ccw(c71.5,13.5) 74.6,13.5 ccw(c71.5,13.5) 71.5,16.6 ccw(c71.5,13.5) 68.4,13.5 ccw(c71.5,13.5)
  region: 13.5,10.4 cw(c13.5,13.5) 10.4,13.5 cw(c13.5,13.5) 13.5,16.6 cw(c13.5,13.5) 16.6,13.5 cw(c13.5,13.5)
  lines w0.25: 10,13 ccw(c13,13) 13,10 56.5,10 ccw(c56.5,11) 57.5,11 57.5,25 cw(c58.5,25) 58.5,26 66.5,26 cw(c66.5,25) 67.5,25 67.5,11 ccw(c68.5,11) 68.5,10 72,10 ccw(c72,13) 75,13 75,63 ccw(c72,63) 72,66 13,66 ccw(c13,63) 10,63 10,50 ccw(c11,50) 11,49 14,49 cw(c14,48) 15,48 15,32 cw(c14,32) 14,31 11,31 ccw(c11,30) 10,30 10,13

## Other copper
Bottom Layer:
  text "Design By / Robert P." at 70.978,25.457 h0.9 r90

## Silkscreen, mask and mechanical layers (free items; w line width, h text height)
Top Overlay:
  drawing of 41 lines, arcs and shapes, not listed
  text "SUBCONN" at 64.801,59.115 h0.6
  text "CAM TRIG" at 10.301,58.215 h0.6
  text "Write / Prot" at 37.124,57.48 h0.6 r90
  text "Pi / 3V3" at 15.25,50.42 h0.6
  text "V+" at 60.5,46.7 h0.9 r90
  text "V-" at 62.6,46.7 h0.9 r90
  text "VIN" at 67.813,46.1 h0.6
  text "ON" at 66.713,44.9 h0.6
  text "H" at 60.5,44.2 h0.9 r90
  text "L" at 62.6,44.2 h0.9 r90
  text "12-21V In" at 64.68,44.201 h0.6 r90
  text "CAN TERM" at 63.601,41.14 h1.2
  text "OFF" at 66.72,40.136 h0.6
  text "'.ProjectTitle'" at 49.8,35.9 h1.52
  text "PCIe" at 22.45,34.315 h0.6
  text "M.2 / USB" at 67.3,33.72 h0.6
  text "1V8" at 47.417,31.913 h0.6
  text "5V" at 13.6,25.813 h0.6
  text "GND" at 69.385,22.05 h0.6 r90
  text "3V3" at 31.901,21 h0.6
  text "TRIG" at 69.385,18.65 h0.6 r90
  text "CAM TRIG" at 69.701,16.815 h0.6
  text "M.2 3V3" at 16.55,10.9 h0.6
Bottom Overlay:
  drawing of 12 lines, arcs and shapes, not listed